# Altium PCB SBC_PCB.PcbDoc (part 4 of 4)
Units mm, origin at the board's own origin, x right, y up, seen from the top; angles counter-clockwise.
Board outline 85 x 56 mm, 8 copper layers (L1(SIG), L2(GND), L3(PWR), L4(SIG), L5(GND), L6(SIG), L7(GND), L8(SIG)), stack 1.593 mm thick; 597 components, 497 nets, 2394 pads, 229 vias.
Unrouted connection lines stored in the file: 1459.
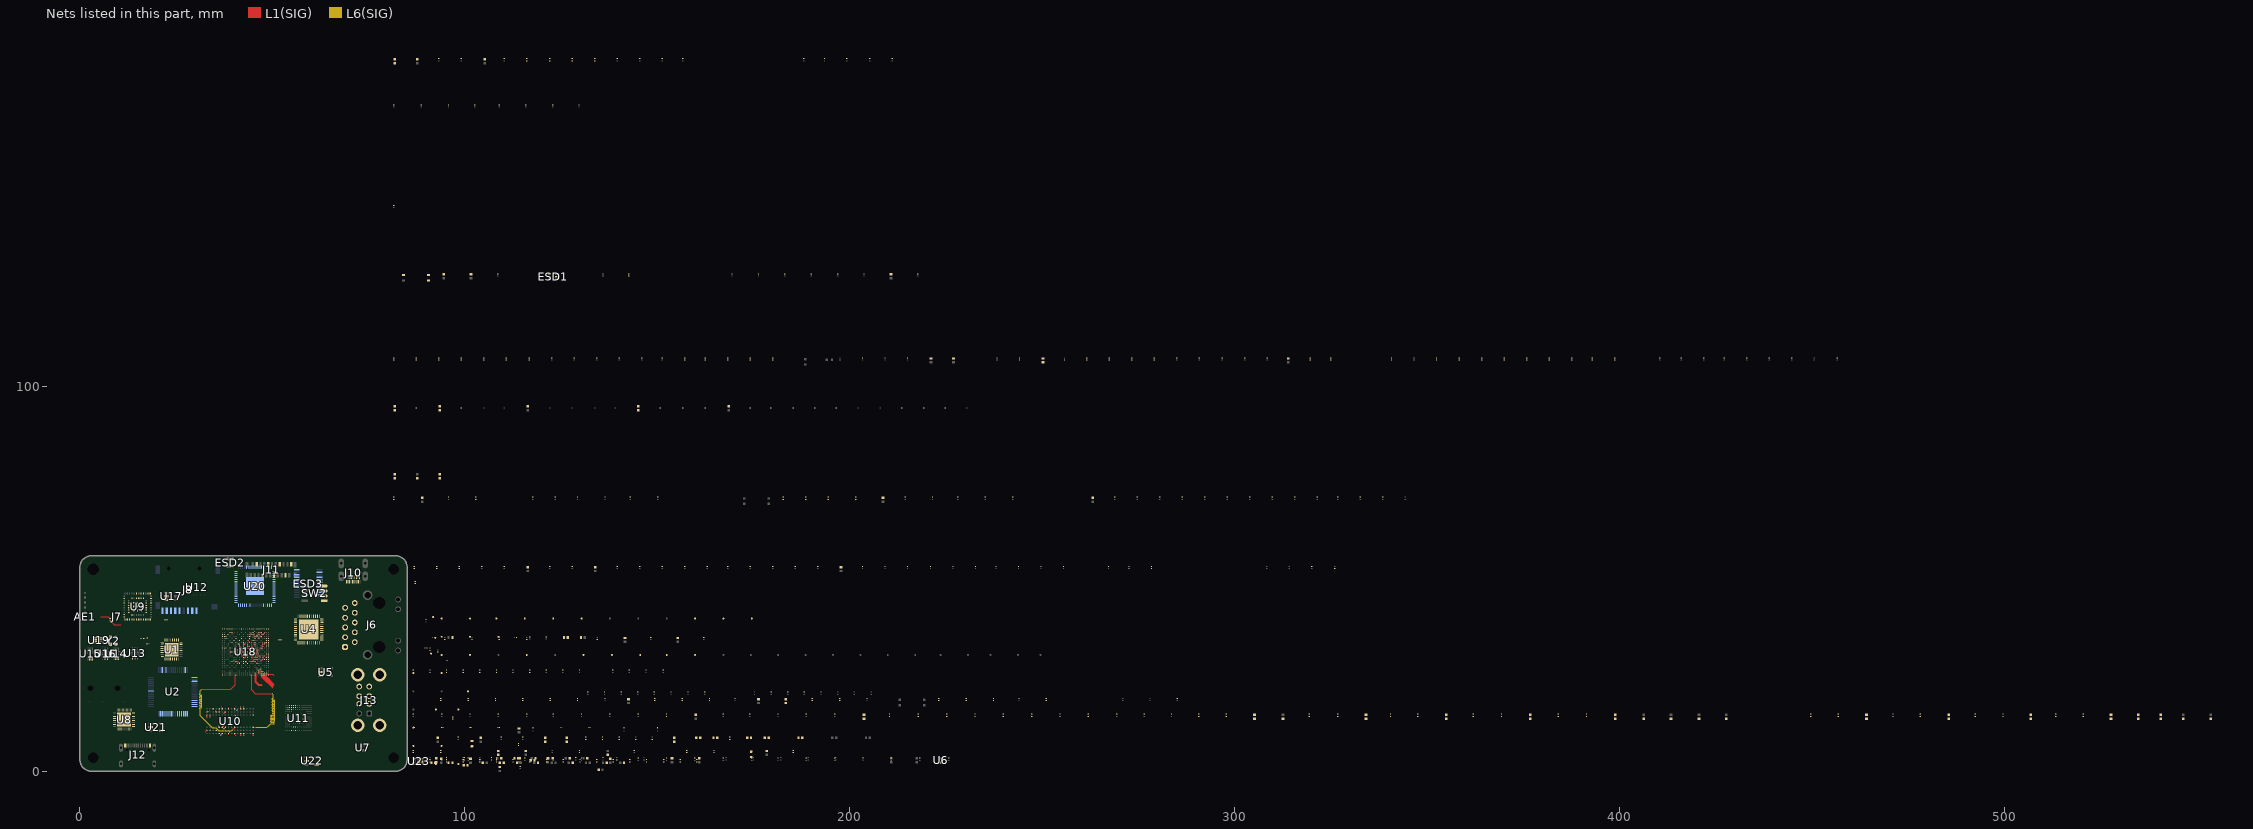
[diagram p5: the nets of this part, all layers, seen from the top]

## Via types
v1: diameter 0.35, hole 0.2, L1(SIG) to L8(SIG), 222 vias
v2: diameter 0.45, hole 0.2, L1(SIG) to L8(SIG), 7 vias

## Nets (pads, with @x,y where several pads share a name; then routed paths per layer and width w, separated by ;. In a path a pad name is that pad's centre, name@x,y a point inside that pad or via, vN(x,y) a via of type N, cw(c..) or ccw(c..) an arc to the next point about the centre after c; other vN are vias at no path point) (continued)
DDR4_LDQS_N: U10.F3 U18.V2 | length 4.6
  L1(SIG) w0.076: U18.V2@45.5,25.5 45.751,25.249 45.751,24.542 45.819,24.475 45.819,24.359
  L1(SIG) w0.11: 45.819,24.359 45.819,23.264 46.464,22.619 47.225,22.619
  L1(SIG) w0.12: U10.F3@37,11.4 37,11.402 37.385,11.787 v1(37.385,11.789)
DDR4_LDQS_P: U10.G3 U18.V1 | length 4.5
  L1(SIG) w0.076: U18.V1@45.5,25 45.5,24.437 45.579,24.359
  L1(SIG) w0.11: 45.579,24.359 45.579,23.165 46.365,22.379 47.319,22.379
  L1(SIG) w0.12: v1(37.415,11.013) v1(37.415,11.013) U10.G3@37.8,11.4 U10.G3@37.8,11.402
DDR4_NC: TP44.TP U10.T7
DDR4_ODT: U10.K3 U18.H1 | length 35.1
  L1(SIG) w0.076: 40.335,24.359 40.335,24.692 40.411,24.768 40.411,24.876 40.5,24.965 U18.H1@40.5,25
  L1(SIG) w0.12: v1(31.496,21.158) 31.503,21.158 31.681,21.336 39.167,21.336 40.335,22.504 40.335,24.359 ; v1(39.878,10.973) 39.878,11.025 40.2,11.347 U10.K3@40.2,11.4
  L6(SIG) w0.11: v1(31.496,21.158) 31.267,20.93 31.267,20.498 31.267,20.262 cw(c31.157,20.262) 31.157,20.152 31.142,20.152 ccw(c31.142,20.08) 31.07,20.08 31.07,19.864 ccw(c31.142,19.864) 31.142,19.792 31.57,19.792 cw(c31.57,19.72) 31.642,19.72 31.642,19.504 cw(c31.57,19.504) 31.57,19.432 31.142,19.432 ccw(c31.142,19.36) 31.07,19.36 31.07,19.144 ccw(c31.142,19.144) 31.142,19.072 31.57,19.072 cw(c31.57,19) 31.642,19 31.642,18.784 cw(c31.57,18.784) 31.57,18.712 31.142,18.712 ccw(c31.142,18.64) 31.07,18.64 31.07,18.424 ccw(c31.142,18.424) 31.142,18.352 31.57,18.352 cw(c31.57,18.28) 31.642,18.28 31.642,18.064 cw(c31.57,18.064) 31.57,17.992 31.142,17.992 ccw(c31.142,17.92) 31.07,17.92 31.07,17.704 ccw(c31.142,17.704) 31.142,17.632 31.57,17.632 cw(c31.57,17.56) 31.642,17.56 31.642,17.344 cw(c31.57,17.344) 31.57,17.272 31.142,17.272 ccw(c31.142,17.2) 31.07,17.2 31.07,16.984 ccw(c31.142,16.984) 31.142,16.912 31.57,16.912 cw(c31.57,16.84) 31.642,16.84 31.642,16.624 cw(c31.57,16.624) 31.57,16.552 31.142,16.552 ccw(c31.142,16.48) 31.07,16.48 31.07,16.264 ccw(c31.142,16.264) 31.142,16.192 31.157,16.192 cw(c31.157,16.082) 31.267,16.082 31.267,16.027 31.267,14.402 34.326,11.343 35.291,11.343 36.068,10.566 39.472,10.566 v1(39.878,10.973)
DDR4_PAR: U10.T3 U18.T1 | length 35.1
  L1(SIG) w0.076: U18.T1@44.5,25 44.5,24.969 44.653,24.816 44.653,24.359
  L1(SIG) w0.12: 44.653,24.359 44.653,21.107 45.593,20.168 50.216,20.168 v1(50.241,20.193) ; U10.T3@45,11.4 45.01,11.39 45.506,11.39 v1(45.517,11.379)
  L6(SIG) w0.11: v1(45.517,11.379) 48.59,11.379 48.95,11.739 49.553,12.342 cw(c49.631,12.264) 49.631,12.374 50.416,12.374 ccw(c50.416,12.446) 50.488,12.446 50.488,12.662 ccw(c50.416,12.662) 50.416,12.734 49.702,12.734 cw(c49.702,12.806) 49.63,12.806 49.63,13.022 cw(c49.702,13.022) 49.702,13.094 50.519,13.094 ccw(c50.519,13.166) 50.591,13.166 50.591,13.382 ccw(c50.519,13.382) 50.519,13.454 49.71,13.454 cw(c49.71,13.526) 49.638,13.526 49.638,13.742 cw(c49.71,13.742) 49.71,13.814 50.519,13.814 ccw(c50.519,13.886) 50.591,13.886 50.591,14.102 ccw(c50.519,14.102) 50.519,14.174 49.71,14.174 cw(c49.71,14.246) 49.638,14.246 49.638,14.462 cw(c49.71,14.462) 49.71,14.534 50.519,14.534 ccw(c50.519,14.606) 50.591,14.606 50.591,14.822 ccw(c50.519,14.822) 50.519,14.894 50.11,14.894 cw(c50.11,14.966) 50.038,14.966 50.038,15.182 cw(c50.11,15.182) 50.11,15.254 50.519,15.254 ccw(c50.519,15.326) 50.591,15.326 50.591,15.542 ccw(c50.519,15.542) 50.519,15.614 50.04,15.614 cw(c50.04,15.686) 49.968,15.686 49.968,15.902 cw(c50.04,15.902) 50.04,15.974 50.519,15.974 ccw(c50.519,16.046) 50.591,16.046 50.591,16.262 ccw(c50.519,16.262) 50.519,16.334 50.04,16.334 cw(c50.04,16.406) 49.968,16.406 49.968,16.622 cw(c50.04,16.622) 50.04,16.694 50.519,16.694 ccw(c50.519,16.766) 50.591,16.766 50.591,16.982 ccw(c50.519,16.982) 50.519,17.054 50.04,17.054 cw(c50.04,17.126) 49.968,17.126 49.968,17.342 cw(c50.04,17.342) 50.04,17.414 50.519,17.414 ccw(c50.519,17.486) 50.591,17.486 50.591,17.702 ccw(c50.519,17.702) 50.519,17.774 50.04,17.774 cw(c50.04,17.846) 49.968,17.846 49.968,18.062 cw(c50.04,18.062) 50.04,18.134 50.519,18.134 ccw(c50.519,18.206) 50.591,18.206 50.591,18.422 ccw(c50.519,18.422) 50.519,18.494 50.04,18.494 cw(c50.04,18.566) 49.968,18.566 49.968,18.782 cw(c50.04,18.782) 50.04,18.854 50.131,18.854 ccw(c50.131,18.964) 50.241,18.964 50.241,19.533 v1(50.241,20.193)
DDR4_TEN: R101.2 R104.1 U10.N9 | length 0.6
  L1(SIG) w0.076: U10.N9@42.596,16.196 U10.N9@42.6,16.2 42.6,16.756 v1(42.604,16.76)
DDR4_UDQS_N: U10.A7 U18.E2 | length 0.6
  L1(SIG) w0.076: v1(32.992,14.036) 32.996,14.04 32.996,14.596 U10.A7@33,14.6
DDR4_UDQS_P: U10.B7 U18.E1 | length 0.6
  L1(SIG) w0.076: v1(33.792,14.036) 33.796,14.04 33.796,14.596 U10.B7@33.8,14.6
DDR4_VREFCA: C115.2 C116.1 C117.1 C118.1 R106.2 R107.1 U10.M1 | length 0.5
  L1(SIG) w0.076: U10.M1@41.796,9.804 U10.M1@41.8,9.8 41.8,9.305 v1(41.804,9.301)
DFP_USB1_EN: R186.1 U18.C20 U21.4
DFP_USB1_N: ESD10.2 J13.2 U18.AD11
DFP_USB1_P: ESD9.2 J13.3 U18.AE11
DFP_USB1_VBUS_SENSE: R184.2 R185.1 U18.AC11 | length 0.4
  L1(SIG) w0.076: v1(47.574,29.997) 47.575,29.999 47.999,29.999 U18.AC11@48,30
DFP_USB1_VBUS_ZN: D9.1 R182.2 R184.1
DFP_USB2_EN: R194.1 U18.F18 U22.4
DFP_USB2_N: ESD12.2 J13.6 U18.AE9
DFP_USB2_P: ESD11.2 J13.7 U18.AD10
DFP_USB2_VBUS_SENSE: R192.2 R193.1 U18.AB10 | length 0.5
  L1(SIG) w0.076: U18.AB10@47.5,29.5 47.505,29.495 47.975,29.495 v1(47.981,29.489)
DFP_USB2_VBUS_ZN: D10.1 R189.2 R192.1
DUSB_SH_GND: C265.2 J13.SH
EEPROM_DO: R12.1 R16.1
EEPROM_ORG: 
EFUSE_DV_DT: C268.2 TP54.TP U23.1
EFUSE_EN: R212.2 R214.1 TP52.TP U23.4
EFUSE_FLT: R213.2 TP53.TP U23.6
EFUSE_ILIM: R215.1 TP55.TP U23.7
EMMC_CLK: R118.1 U18.Y3 | length 0.7
  L1(SIG) w0.076: v1(46.021,26.492) 46.021,26.485 46.5,26.006 U18.Y3@46.5,26
EMMC_CLK_R: R118.2 R119.1 U11.M6
EMMC_CMD: R108.2 U11.M5 U18.AB1 | length 4.1
  L1(SIG) w0.076: U18.AB1@47.5,25 47.5,24.496 47.638,24.359
  L1(SIG) w0.12: 47.638,24.359 50.032,21.965
EMMC_DATA0: R116.2 U11.A3 U18.AA2 | length 5.2
  L1(SIG) w0.076: U18.AA2@47,25.5 47.249,25.251 47.249,24.36 47.25,24.359
  L1(SIG) w0.12: 47.25,24.359 47.336,24.273 47.412,24.273 50.054,21.631
EMMC_DATA1: R115.2 U11.A4 U18.AA1
EMMC_DATA2: R114.2 U11.A5 U18.AA3 | length 0.7
  L1(SIG) w0.076: U18.AA3@47,26 47.005,26.005 47.646,26.005 v1(47.65,26.01)
EMMC_DATA3: R113.2 U11.B2 U18.Y4 | length 0.5
  L1(SIG) w0.076: U18.Y4@46.5,26.5 46.522,26.521 46.994,26.521 v1(47.015,26.543)
EMMC_DATA4: R112.2 U11.B3 U18.AB2 | length 4.4
  L1(SIG) w0.076: U18.AB2@47.5,25.5 47.751,25.249 47.751,24.556 47.949,24.359
  L1(SIG) w0.12: 47.949,24.359 50.136,22.171
EMMC_DATA5: R111.2 U11.B4 U18.AC1 | length 3.6
  L1(SIG) w0.076: U18.AC1@48,25 48,24.618 48.26,24.359
  L1(SIG) w0.12: 48.26,24.359 50.292,22.327
EMMC_DATA6: R110.2 U11.B5 U18.AD2 | length 2.1
  L1(SIG) w0.076: U18.AD2@48.5,25.5 48.751,25.249 49.922,25.249
  L1(SIG) w0.12: 49.922,25.249 50.037,25.249 50.394,24.892
EMMC_DATA7: R109.2 U11.B6 U18.AC2 | length 3.8
  L1(SIG) w0.076: U18.AC2@48,25.5 48.251,25.249 48.251,24.723 48.616,24.359
  L1(SIG) w0.12: 48.616,24.359 50.343,22.631
EMMC_STROBE: R120.1 U11.H5
EMMC_VDDI: C130.1 U11.C2
ETH_MDI_TR0_N: J6.3 U4.3
ETH_MDI_TR0_P: J6.2 U4.2
ETH_MDI_TR1_N: J6.7 U4.6
ETH_MDI_TR1_P: J6.4 U4.5
ETH_MDI_TR2_N: J6.6 U4.8
ETH_MDI_TR2_P: J6.5 U4.7
ETH_MDI_TR3_N: J6.9 U4.11
ETH_MDI_TR3_P: J6.8 U4.10
ETH_PHY_CLK_IN: TP5.TP U4.46
ETH_PHY_INT: R25.2 TP4.TP U4.39
ETH_PHY_ISET: R46.1 U4.48
ETH_RGMII_MDC: U4.37
ETH_RGMII_MDIO: R27.2 U4.38
ETH_RGMII_RXC: R32.1
ETH_RGMII_RXCTL: R33.1
ETH_RGMII_RXD0: R28.1
ETH_RGMII_RXD1: R29.1
ETH_RGMII_RXD2: R30.1
ETH_RGMII_RXD3: R31.1
ETH_RGMII_TXC: R44.1
ETH_RGMII_TXCTL: R45.1
ETH_RGMII_TXD0: R40.1
ETH_RGMII_TXD1: R41.1
ETH_RGMII_TXD2: R42.1
ETH_RGMII_TXD3: R43.1
ETH_SH_GND: C56.2 J6.10
FLASH_QSPI_CS: R125.2 U12.C2 U18.F23 | length 0.4
  L1(SIG) w0.076: U18.F23@39.5,36 39.504,35.996 39.925,35.996 v1(39.929,35.992)
FLASH_QSPI_IO0: R124.2 U12.D3 U18.E25
FLASH_QSPI_IO1: R123.2 U12.D2 U18.G24
FLASH_QSPI_IO2: R122.2 U12.C4 U18.F25
FLASH_QSPI_IO3: R121.2 U12.D4 U18.F24
FLASH_QSPI_SCK: R127.1 U18.H24
FLASH_RESET: R126.2 U12.A4 U18.E24
FS: R2.2 U1.7
FTDI_EECDATA: U2.61
FTDI_EECLK: R13.1 U2.62
FTDI_EECS: R14.1 U2.63
FTDI_OSCI: U2.2
FTDI_OSCO: C22.1 U2.3
FTDI_REF: U2.6
FTDI_RESET: U2.14
GND: AE1.1 C7.2 C11.2 C12.2 C13.2 C14.2 C15.2 C16.2 C17.2 C18.2 C19.2 C20.2 C21.2 C22.2 C23.2 C24.2 C25.2 C26.2 C27.2 C28.2 C29.2 C30.2 C31.2 C32.2 C33.2 C34.2 C35.2 C36.2 C37.2 C38.2 C39.2 C40.2 C41.2 C42.2 C43.2 C44.2 C45.2 C46.2 C47.2 C48.2 C49.2 C50.2 C51.2 C52.2 C53.2 C54.2 C55.2 C56.1 C59.2 C62.2 C67.2 C69.2 C71.2 C72.2 C73.2 C74.2 C75.2 C76.2 C77.2 C78.2 C79.2 C80.2 C81.2 C83.2 C84.2 C85.2 C86.2 C87.2 C88.2 C90.2 C91.2 C92.2 C93.2 C94.2 C95.2 C96.2 C97.2 C98.2 C99.2 C100.2 C101.2 C102.2 C103.2 C104.2 C105.2 C106.2 C107.2 C108.2 C109.2 C110.2 C111.2 C116.2 C117.2 C118.2 C119.2 C120.2 C121.2 C122.2 C123.2 C124.2 C125.2 C126.2 C127.2 C128.2 C129.2 C130.2 C131.2 C132.2 C133.2 C134.2 C135.2 C136.2 C137.2 C138.2 C139.2 C140.2 C141.2 C142.2 C143.2 C144.2 C145.2 C146.2 C147.2 C148.2 C149.2 C150.2 C151.2 C152.2 C153.2 C154.2 C155.2 C156.2 C157.2 C158.2 C159.2 C160.2 C161.2 C162.2 C163.2 C164.2 C165.2 C166.2 C167.2 C168.2 C169.2 C170.2 C171.2 C172.2 C173.2 C174.2 C175.2 C176.2 C177.2 C178.2 C179.2 C180.2 C181.2 C182.2 C183.2 C184.2 C185.2 C186.2 C187.2 C188.2 C189.2 C190.2 C191.2 C192.2 C193.2 C194.2 C195.2 C196.2 C197.2 C198.2 C199.2 C200.2 C201.2 C202.2 C203.2 C204.2 C205.2 C206.2 C207.2 C208.2 C209.2 C210.2 C211.2 C212.2 C213.2 C214.2 C215.2 C216.2 C217.2 C218.2 C219.2 C220.2 C221.2 C222.2 C223.2 C224.2 C225.2 C226.2 C227.2 C228.2 C229.2 C230.2 C231.2 C232.2 C233.2 C234.2 C235.2 C236.2 C237.2 C238.2 C239.2 C240.2 C241.2 C242.2 C243.2 C244.2 C245.2 C246.2 C247.2 C248.2 C249.2 C250.2 C251.2 C252.2 C253.2 C254.2 C255.2 C256.2 C257.2 C258.2 C259.2 C261.2 C263.2 C264.1 C265.1 C266.2 C267.2 C268.1 D9.2 D10.2 ESD1.2 ESD2.2 ESD3.6 ESD3.14 ESD3.19 ESD4.2 ESD5.2 ESD6.1 ESD7.1 ESD8.2 ESD9.1 ESD10.1 ESD11.1 ESD12.1 J7.2 J7.4 J8.6 J11.1 J11.4 J11.7 J11.10 J11.13 J11.16 J11.19 J12.A1 J12.A12 J12.B1 J12.B12 J13.4 J13.8 L6.1 L7.1 R5.1 R8.1 R9.1 R10.1 R18.1 R34.2 R35.2 R36.2 R37.2 R38.2 R39.2 R46.2 R54.2 R55.2 R56.2 R57.2 R58.2 R59.2 R60.1 R69.1 R70.1 R82.2 R90.2 R94.2 R95.2 R96.2 R102.2 R103.2 R104.2 R105.2 R107.2 R119.2 R120.2 R128.2 R136.2 R145.2 R146.2 R155.2 R156.2 R157.2 R158.2 R159.2 R160.2 R161.2 R162.2 R163.2 R164.2 R178.2 R179.2 R180.2 R185.2 R186.2 R187.2 R188.2 R190.1 R193.2 R194.2 R195.1 R204.2 R205.2 R206.2 R207.2 R208.2 R209.2 R210.2 R211.2 R214.2 R215.2 U1.12 U1.24 U1.28 U1.33 U2.1 U2.5 U2.10 U2.11 U2.13 U2.15 U2.25 U2.35 U2.47 U2.51 U4.49 U5.2 U5.3 U6.2 U7.2 U8.15 U8.33 U9.1 U9.14 U9.16 U9.21 U9.23 U9.24 U9.27 U9.34 U9.41 U9.57 U9.69 U9.70 U9.71 U9.72 U9.73 U9.74 U9.75 U9.76 U9.77 U10.A2 U10.A8 U10.B2 U10.C9 U10.D2 U10.D8 U10.E1 U10.E3 U10.E8 U10.E9 U10.F1 U10.G8 U10.H1 U10.H9 U10.K1 U10.K9 U10.M9 U10.N1 U10.T1 U11.A6 U11.C4 U11.E7 U11.G5 U11.H10 U11.J5 U11.K8 U11.N2 U11.N5 U11.P4 U11.P6 U12.B3 U13.5 U13.7 U13.8 U14.6 U14.7 U14.8 U15.6 U15.7 U15.8 U16.6 U16.7 U16.8 U17.2 U18.A1 U18.A24 U18.A25 U18.AA11 U18.AB9 U18.AD1 U18.AD9 U18.AD12 U18.AD16 U18.AD25 U18.AE1 U18.AE8 U18.AE12 U18.AE16 U18.AE24 U18.AE25 U18.B25 U18.F13 U18.G13 U18.G19 U18.H13 U18.H16 U18.H18 U18.H20 U18.J7 U18.J13 U18.K7 U18.K13 U18.K15 U18.K19 U18.L20 U18.M7 U18.M8 U18.M10 U18.M12 U18.M13 U18.M17 U18.M18 U18.N15 U18.P7 U18.P10 U18.P13 U18.R13 U18.R15 U18.R18 U18.R20 U18.T8 U18.T13 U18.T14 U18.T16 U18.T17 U18.T18 U18.U8 U18.U19 U18.V9 U18.V10 U18.V11 U18.V13 U18.V16 U18.V18 U18.W7 U18.Y2 U19.4 U20.43 U20.55 U20.57 U20.63 U20.70 U20.73 U21.2 U22.2 U23.8 Y2.2 | length 15.1
  L1(SIG) w0.076: v1(35.89,11.836) 35.89,11.773 36.2,11.463 U10.E3@36.2,11.4 ; U10.H1@38.596,9.804 U10.H1@38.6,9.8 38.6,9.305 v1(38.604,9.301) ; U10.H9@38.596,16.196 U10.H9@38.6,16.2 38.6,16.756 v1(38.604,16.76) ; v1(39.04,30.988) 39.046,30.994 39.494,30.994 U18.F13@39.5,31 ; U10.K1@40.196,9.804 U10.K1@40.2,9.8 40.2,9.305 v1(40.204,9.301) ; v1(42.012,30.988) 42.018,30.994 42.494,30.994 U18.M13@42.5,31 ; U18.M10@42.5,29.5 42.518,29.482 42.959,29.482 v1(42.977,29.464) ; U18.M17@42.5,33 42.525,33.025 42.945,33.025 v1(42.97,33.051) ; U10.N1@42.596,9.804 U10.N1@42.6,9.8 42.6,9.305 v1(42.604,9.301) ; v1(43.51,32.004) 43.512,32.002 43.998,32.002 U18.R15@44,32 ; U18.R18@44,33.5 44.009,33.509 44.009,34.001 v1(44.018,34.011) ; U18.T13@44.5,31 44.519,31.019 44.964,31.019 v1(44.983,31.039) ; U18.T16@44.5,32.5 44.519,32.481 44.913,32.481 v1(44.933,32.461) ; v1(44.984,29) 44.992,28.993 44.992,28.508 U18.U8@45,28.5 ; U10.T1@44.996,9.804 U10.T1@45,9.8 45,9.305 v1(45.004,9.301) ; U18.U19@45,34 45.02,33.98 45.421,33.98 v1(45.441,33.96) ; U18.V11@45.5,30 45.501,29.999 v1(46.025,29.997) v1(46.025,29.997) ; U18.W7@46,28 46.005,27.995 46.503,27.995 v1(46.507,27.991) ; v1(46.103,25.948) 46.103,25.922 46.5,25.526 U18.Y2@46.5,25.5 ; v1(47.041,28.981) 47.05,28.991 47.491,28.991 U18.AB9@47.5,29
  L1(SIG) w0.12: v1(32.615,10.213) v1(32.615,10.213) U10.A2@33,10.6 U10.A2@33,10.602 ; U10.A8@33,15.4 33.039,15.4 33.387,15.748 v1(33.426,15.748) ; v1(35.013,15.785) v1(35.013,15.785) U10.D8@35.4,15.4 U10.D8@35.402,15.4 ; U10.E8@36.2,15.398 U10.E8@36.2,15.4 v1(36.585,15.787) v1(36.585,15.787) ; v1(36.615,9.413) v1(36.615,9.413) U10.F1@37,9.8 U10.F1@37,9.802 ; v1(37.415,15.013) 37.415,15.015 U10.G8@37.8,15.4 U10.G8@37.8,15.4 ; v1(40.198,16.747) v1(40.198,16.747) 40.199,16.201 U10.K9@40.2,16.2 ; v1(41.811,16.754) 41.812,16.753 41.812,16.208 U10.M9@41.813,16.206
  L1(SIG) w0.3: v1(40.475,28.029) 40.497,28.007 40.993,28.007 U18.J7@41,28
  other v1: 43.967,35.535
  other v2: 1.327,41.284 1.327,42.564 1.327,43.844 1.327,45.124 1.327,46.404
GPIO_1: TP33.TP U9.45
HDM_CONN_CEC: ESD3.7 J10.15
HDM_CONN_HPD: ESD3.10 J10.1
HDM_CONN_SCL: ESD3.8 J10.17
HDM_CONN_SDA: ESD3.9 J10.18
HDMI_CONN_TX0_N: ESD3.17 J10.11 U20.61
HDMI_CONN_TX0_P: ESD3.18 J10.9 U20.62
HDMI_CONN_TX1_N: ESD3.20 J10.8 U20.64
HDMI_CONN_TX1_P: ESD3.21 J10.6 U20.65
HDMI_CONN_TX2_N: ESD3.22 J10.5 U20.67
HDMI_CONN_TX2_P: ESD3.23 J10.3 U20.68
HDMI_CONN_TXC_N: J10.14 U20.58
HDMI_CONN_TXC_P: ESD3.16 J10.12 U20.59
HDMI_D0: U18.U22 U20.32 | length 0.4
  L1(SIG) w0.076: U18.U22@45,35.5 45.033,35.467 45.331,35.467 v1(45.367,35.43)
HDMI_D1: U18.V24 U20.31
HDMI_D2: U18.W25 U20.30
HDMI_D3: U18.W24 U20.29
HDMI_D4: U18.Y25 U20.28
HDMI_D5: U18.Y24 U20.27
HDMI_D6: U18.Y23 U20.25 | length 0.4
  L1(SIG) w0.076: v1(46.076,35.992) 46.08,35.996 46.496,35.996 U18.Y23@46.5,36
HDMI_D7: U18.AA25 U20.24
HDMI_D8: U18.V21 U20.23 | length 0.5
  L1(SIG) w0.076: v1(45.033,34.872) 45.134,34.872 45.261,34.999 U18.V21@45.5,35 U18.V21@45.5,35
HDMI_D9: U18.W21 U20.20 | length 0.3
  L1(SIG) w0.076: U18.W21@46,35 46.006,35.006 46.006,35.339 v1(46.012,35.345)
HDMI_D10: U18.V20 U20.19 | length 0.5
  L1(SIG) w0.076: U18.V20@45.5,34.5 45.503,34.497 45.945,34.497 v1(45.949,34.493)
HDMI_D11: U18.AA23 U20.18 | length 0.4
  L1(SIG) w0.076: U18.AA23@47,36 47.024,36.024 47.363,36.024 v1(47.386,36.047)
HDMI_D12: U18.AB25 U20.17
HDMI_D13: U18.AA24 U20.16
HDMI_D14: U18.Y22 U20.15 | length 0.5
  L1(SIG) w0.076: U18.Y22@46.5,35.5 46.517,35.517 46.922,35.517 v1(46.939,35.535)
HDMI_D15: U18.AA21 U20.14 | length 0.4
  L1(SIG) w0.076: U18.AA21@47.001,35.001 v1(47.396,35.001)
HDMI_D16: R154.2 R164.1 R169.1 U18.R24
HDMI_D17: R153.2 R163.1 R170.1 U18.R25
HDMI_D18: R152.2 R162.1 R171.1 U18.T25
HDMI_D19: R151.2 R161.1 R172.1 U18.R21 | length 0.4
  L1(SIG) w0.076: U18.R21@44,35 44.019,35.019 44.386,35.019 v1(44.405,35.039)
HDMI_D20: R150.2 R160.1 R173.1 U18.T22 | length 0.4
  L1(SIG) w0.076: U18.T22@44.5,35.5 44.513,35.513 44.513,35.902 v1(44.526,35.916)
HDMI_D21: R149.2 R159.1 R174.1 U18.T24
HDMI_D22: R148.2 R158.1 R175.1 U18.U25
HDMI_D23: R147.2 R157.1 R176.1 U18.U24
HDMI_DE: U18.Y20 U20.33 | length 0.4
  L1(SIG) w0.076: U18.Y20@46.5,34.5 46.504,34.504 46.504,34.87 v1(46.507,34.874)
HDMI_HSYNC: U18.AB24 U20.34
HDMI_I2C_ADDR: R167.2 U20.72
HDMI_I2C_SCL: U20.1
HDMI_I2C_SDA: U20.2
HDMI_I2S_DIN: U18.L25 U20.41
HDMI_I2S_SCK: U18.M24 U20.45
HDMI_I2S_WS: U18.U23 U20.44 | length 0.4
  L1(SIG) w0.076: U18.U23@45,36 45.033,36.033 45.294,36.033 v1(45.34,36.079)
HDMI_IDCK: R168.1 U18.AC24
HDMI_TX_CEC: U20.71
HDMI_TX_HPD: U20.54
HDMI_TX_SCL: U20.49
HDMI_TX_SDA: U20.48
HDMI_VSYNC: U18.AC25 U20.35
I2C_SCl: U1.16
I2C_SDA: U1.17
I2S_ADCOUT: R3.1 U18.E15
I2S_BCLK: R1.1 U18.B15
I2S_DACIN: R4.1 U18.C15
I2S_FS: R2.1 U18.A15
IDCK: R168.2 U20.22
JACK_DETECT: TP2.TP U1.3
JTAG_SEL: TP37.TP U9.53
JTAG_TCK: TP38.TP U9.66
JTAG_TDI: TP41.TP U9.64
JTAG_TDO: TP42.TP U9.65
JTAG_TMS: TP40.TP U9.67
LAUXIN: C4.1 U1.19
LDO1_VOUT: C76.1 R74.1 TP20.TP U8.7
LDO2_VOUT: C77.1 R75.1 TP21.TP U8.19
LDO3_VOUT: C78.1 R76.1 TP22.TP U8.21
LDO4_VOUT: C79.1 R77.1 TP23.TP U8.23
LHP: U1.30
LHP_CON: 
LMICN: C7.1 U1.2
LMICP: C8.1 U1.1
LMICP_CON: C8.2 R7.2
LPO_IN: U9.5
LSPKOUT: U1.25
NetAE1_4: AE1.4 C82.2 L7.2 | length 2.6
  L1(SIG) w0.254: 5.461,40.132 7.362,40.132 7.828,39.666 C82.2@7.874,39.666
NetC4_2: C4.2
NetC11_1: C11.1 U1.27
NetC33_1: C33.1 C34.1 FB1.2 U2.9
NetC35_1: C35.1 C36.1 FB2.2 U2.4
NetC43_1: C43.1 C44.1 C45.1 FB3.1 U4.1 U4.12
NetC51_1: C51.1 C52.1 C53.1 C54.1 FB4.1 U4.23 U4.27 U4.31 U4.40
NetC55_1: C55.1 J6.1
NetC82_1: C82.1 J7.1 L6.2 | length 3.1
  L1(SIG) w0.254: C82.1@7.874,39.116 7.92,39.116 8.936,38.1 10.546,38.1
NetC89_1: C89.1 R97.1 R98.1
NetC112_2: C112.2 C113.2 C114.2
NetC243_1: C243.1 C244.1 C245.1 FB14.2 U20.60 U20.66
NetC247_1: C247.1 C248.1 C249.1 FB15.2 U20.3 U20.21 U20.46
NetC251_1: C251.1 C252.1 C253.1 C254.1 C255.1 C256.1 FB16.2 U20.5 U20.12 U20.26 U20.42 U20.47 U20.53
NetESD3_5: ESD3.5 ESD3.12 R181.2
NetJ7_3: J7.3@10.475,40.132 U9.22
NetL4_1: U8.29
NetL5_1: U8.27
NetR5_2: R5.2 U1.18
NetR47_2: R47.2 R54.1 U4.13
NetR48_2: R48.2 R55.1 U4.14
NetR49_2: R49.2 R56.1 U4.18
NetR50_2: R50.2 R57.1 U4.16
NetR51_2: R51.2 R58.1 U4.15
NetR52_2: R52.2 R53.2 R59.1 U4.42
NetR53_1: R53.1
NetR105_1: R105.1 U10.F9 | length 0.6
  L1(SIG) w0.076: U10.F9@36.996,16.196 U10.F9@37,16.2 37,16.756 v1(37.004,16.76)
NetR138_1: R138.1 TP47.TP Y2.1
NetR144_1: R144.1 TP48.TP U19.2
NetR177_2: R177.2 R179.1 U20.69
NetR178_1: R178.1 U20.36
NetR180_1: R180.1 U20.56
NetR197_2: R197.2 SW2.8
NetR198_2: R198.2 SW2.7
NetR199_2: R199.2 SW2.6
NetR200_2: R200.2 SW2.5
NetTP1_TP: TP1.TP U1.15
NetTP3_TP: TP3.TP U1.6
NetTP49_TP: TP49.TP U20.50
NetU18_AA15: U18.AA15 | length 0.4
  L1(SIG) w0.076: U18.AA15@47,32 47.004,31.996 47.424,31.996 v1(47.428,31.992)
NetU18_AB16: U18.AB16 | length 0.4
  L1(SIG) w0.076: v1(47.117,32.563) 47.148,32.531 47.469,32.531 U18.AB16@47.5,32.5
NetU18_AB17: U18.AB17 | length 0.4
  L1(SIG) w0.076: v1(47.426,33.356) 47.467,33.316 47.467,33.033 U18.AB17@47.5,33
NetU18_AB22: U18.AB22 | length 0.7
  L1(SIG) w0.076: U18.AB22@47.5,35.5 47.547,35.5 47.608,35.561 47.626,35.561 v1(48.031,35.966)
NetU18_AC17: U18.AC17 | length 0.4
  L1(SIG) w0.076: U18.AC17@48,33 48.033,33.033 48.033,33.305 v1(48.076,33.348)
NetU18_AD17: U18.AD17
NetU18_AD18: U18.AD18
NetU18_AD19: U18.AD19
NetU18_AD20: U18.AD20
NetU18_AD24: U18.AD24
NetU18_AE17: U18.AE17
NetU18_AE18: U18.AE18
NetU18_AE19: U18.AE19
NetU18_AE20: U18.AE20
OSC_OUT: R139.1 Y2.3
OSC_OUT_BUFF_IN: U19.1
OUT0: R140.1 U19.3
OUT1: R141.1 U19.8
OUT2: R142.1 U19.5
OUT3: R143.1 U19.7
PCM_CLK: R89.2 U9.7
PMIC_GPIO: TP24.TP U8.16
PMIC_LPM_EN0: R81.2 TP29.TP U8.31
PMIC_MODE_RESET: TP30.TP U8.28
PMIC_SCL: U8.10
PMIC_SDA: U8.9
PMIIC_GPIO2: TP26.TP U8.17
PWR_EN: D5.2 D6.2 R137.2 TP46.TP U17.3
QSPI_SCK: R127.2 R128.1 U12.B2
RAUXIN: C3.1 U1.20
RAUXIN_CON: C3.2
RF_SW_CTRL_0: TP31.TP U9.26
RF_SW_CTRL_5: TP32.TP U9.25
RGMII_RXC: R20.2 R32.2 R35.1 U4.36
RGMII_RXCTL: R19.2 R33.2 R34.1 U4.34
RGMII_RXD0: R24.2 R28.2 R39.1 U4.33
RGMII_RXD1: R23.2 R29.2 R38.1 U4.32
RGMII_RXD2: R22.2 R30.2 R37.1 U4.30
RGMII_RXD3: R21.2 R31.2 R36.1 U4.29
RGMII_TXC: R44.2 U4.25
RGMII_TXCTL: R45.2 U4.26
RGMII_TXD0: R40.2 U4.19
RGMII_TXD1: R41.2 U4.20
RGMII_TXD2: R42.2 U4.21
RGMII_TXD3: R43.2 U4.22
RHP: C12.1 R6.1 R7.1 U1.29 U1.32
RHP_CON: 
RMICN: C10.1 U1.5
RMICN_CON: C10.2 R8.2
RMICP: C9.1 U1.4
RMICP_CON: C9.2 R6.2
RSPKOUT: U1.23
SD_CD: ESD2.4 J8.9 R129.2 TP45.TP U18.D17
SD_CLK: R135.1 U18.B22
SD_CLK_R: ESD2.6 J8.5 R135.2 R136.1
SD_CMD: ESD2.1 J8.3 R130.2 U18.A21
SD_DATA0: ESD1.1 J8.7 R134.2 U18.A22
SD_DATA1: ESD1.6 J8.8 R133.2 U18.B21
SD_DATA2: ESD1.4 J8.1 R132.2 U18.C21
SD_DATA3: ESD1.3 J8.2 R131.2 U18.D22
SDIO_CLK: R88.2 U9.33
SOC_VPP: U18.J8 | length 0.5
  L1(SIG) w0.076: U18.J8@41,28.5 41.008,28.492 41.459,28.492 v1(41.467,28.483)
SR_VLX: U9.2
STRAP_0: R91.2 R94.1 U9.56
STRAP_1: R92.2 R95.1 U9.54
STRAP_2: R93.2 R96.1 U9.55
TRST_L: TP43.TP U9.63
USB1_RCLAIB: R156.1 U18.AE10
USB2_MONCDR: TP39.TP U9.48
USB2_RCLAIB: R155.1 U18.AC9
USB2_RREF: R90.1 U9.50
uSD_PWR_EN: D5.1
UUSB_SH_GND: C264.2
VDD1P8: C81.1 U8.2 U8.3 U8.14
VDD_CORE: C157.1 C158.1 C159.1 C160.1 C161.1 C162.1 C163.1 C164.1 C165.1 C166.1 C167.1 C168.1 C169.1 C170.1 C171.1 C172.1 C173.1 C174.1 C221.1 FB5.2 FB6.2 R71.2 U18.F8 U18.H8 U18.J11 U18.J14 U18.K17 U18.L12 U18.L15 U18.M16 U18.N8 U18.N11 U18.N13 U18.P17 U18.R11 U18.R14 U18.U12 U18.V8 U18.V15 U18.V17 | length 4.5
  L1(SIG) w0.076: v1(40.03,28.55) 40.055,28.525 40.475,28.525 U18.H8@40.5,28.5 ; v1(40.513,31.521) 40.524,31.511 40.989,31.511 U18.J14@41,31.5 ; v1(41.097,33.045) 41.12,33.023 41.477,33.023 U18.K17@41.5,33 ; v1(41.504,30.48) 41.514,30.49 41.99,30.49 U18.L12@42,30.5 ; U18.M16@42.5,32.5 42.533,32.467 42.533,32.195 v1(42.576,32.152) ; U18.N11@43,30 43.027,29.973 43.407,29.973 v1(43.434,29.947) ; U18.N8@43,28.5 v1(43.485,28.499) ; v1(45.147,33.075) 45.189,33.033 45.467,33.033 U18.V17@45.5,33 ; U18.V8@45.501,28.499 v1(45.949,28.499) ; U18.V15@45.5,32 45.502,32.002 45.921,32.002 v1(45.923,32.004)
VDDA_1P8_CSIRX0: C151.1 C152.1 C153.1 FB7.1 U18.W14 | length 0.5
  L1(SIG) w0.076: U18.W14@46,31.5 46.002,31.498 46.455,31.498 v1(46.457,31.496)
VDDA_1P8_OLDI0: C175.1 C176.1 C177.1 FB9.1 U18.W9 U18.W10 | length 0.5
  L1(SIG) w0.076: U18.W9@46,29 46.047,29 46.171,29.124 46.371,29.124 v1(46.423,29.177)
VDDA_1P8_USB: C154.1 C155.1 C156.1 FB8.1 U18.Y11 | length 0.6
  L1(SIG) w0.076: U18.Y11@46.5,30 46.76,29.74 46.76,29.618 v1(46.812,29.566)
VDDA_CORE_CSIRX0: C148.1 C149.1 C150.1 FB6.1 U18.W13 | length 0.7
  L1(SIG) w0.076: U18.W13@46,31 46.006,31 46.478,30.528 v1(46.48,30.528)
VDDA_CORE_USB: C145.1 C146.1 C147.1 FB5.1 U18.W12 | length 0.5
  L1(SIG) w0.076: v1(45.517,30.505) 45.52,30.503 45.997,30.503 U18.W12@46,30.5
VDDA_MCU: C178.1 C179.1 C180.1 FB10.1 U18.L11 | length 0.5
  L1(SIG) w0.076: U18.L11@42,30 42.001,29.999 v1(42.494,29.997) v1(42.494,29.997)
VDDA_PLL0: C181.1 C182.1 C183.1 FB11.1 U18.U11 | length 0.5
  L1(SIG) w0.076: v1(44.552,30.039) 44.591,30 U18.U11@45,30
VDDA_PLL1: C184.1 C185.1 C186.1 FB12.1 U18.U15 | length 0.5
  L1(SIG) w0.076: v1(44.533,31.949) 44.558,31.974 44.974,31.974 U18.U15@45,32
VDDA_PLL2: C190.1 C191.1 C192.1 FB13.1 U18.L14 | length 0.4
  L1(SIG) w0.076: U18.L14@42,31.5 42.011,31.511 42.407,31.511 v1(42.418,31.521)
VDDR_CORE: C193.1 C194.1 C195.1 C196.1 C197.1 C198.1 C199.1 C200.1 C201.1 R75.2 U18.J12 U18.K16 U18.N12 U18.N14 U18.P16 U18.R12 U18.T10 U18.U14 | length 2.9
  L1(SIG) w0.076: v1(40.538,30.505) 40.541,30.503 40.997,30.503 U18.J12@41,30.5 ; U18.K16@41.5,32.5 41.533,32.467 41.823,32.467 v1(41.862,32.428) ; U18.N12@43,30.5 43.003,30.503 43.56,30.503 v1(43.625,30.568) ; U18.P16@43.5,32.5 43.506,32.506 43.961,32.506 v1(43.967,32.512) ; U18.T10@44.5,29.5 44.525,29.525 44.955,29.525 v1(44.981,29.55) ; U18.U14@45,31.5 45.011,31.511 45.43,31.511 v1(45.441,31.521)
VIN_LDO: C88.1 U9.43
VREGOUT: C24.1 C25.1 C26.1 C27.1 U2.12 U2.37 U2.49 U2.64
VSEL_SD: R82.1 TP28.TP U8.12
WIFI_SDIO_CLK: R88.1 U18.D25
WIFI_SDIO_CMD: R87.2 U9.28 U18.C24
WIFI_SDIO_DATA_0: R86.2 U9.30 U18.B24
WIFI_SDIO_DATA_1: R85.2 U9.29 U18.C25
WIFI_SDIO_DATA_2: R84.2 U9.32 U18.E23
WIFI_SDIO_DATA_3: R83.2 U9.31 U18.D24
WIFI_USB_DM: U9.46
WIFI_USB_DP: U9.47
WL_HOST_WAKE: U9.52
WL_REG_EN: U9.4
XTAL_OUT: C21.1 R17.1
pads on no net: AE1.2 AE1.3 D1.1 D6.1 D7.2 D8.1 D8.2 ESD2.3 ESD3.1 ESD3.2 ESD3.3 ESD3.4 ESD3.11 ESD3.13 J4.2 J4.3 J4.4 J4.5 J4.6 J4.7 J6.11 J6.12 J6.13 J6.14 J6.M1 J6.M2 J6.S1 J6.S2 J7.3@8.79,40.132 J7.3@10.26,40.132 J8.14 J8.15 J8.SH J10.2 J10.4 J10.7 J10.10 J10.13 J10.16 J10.SH J11.SH J12. J12.A8 J12.B8 J12.S1 R11.2 R12.2 R13.2 R14.2 R15.2 R16.2 R17.2 R18.2 R60.2 R80.2 R138.2 R139.2 R140.2 R141.2 R142.2 R143.2 R144.2 R165.2 R190.2 R195.2 TP27.TP TP50.TP U2.21 U2.22 U2.23 U2.24 U2.30 U2.32 U2.33 U2.34 U2.36 U2.43 U2.44 U2.45 U2.46 U2.55 U2.57 U2.58 U2.59 U2.60 U4.44 U4.45 U5.4 U8.25 U9.15 U9.35 U9.36 U9.37 U9.38 U9.39 U9.40 U9.44 U9.58 U9.59 U9.60 U9.61 U9.62 U11.A1 U11.A2 U11.A7 U11.A8 U11.A9 U11.A10 U11.A11 U11.A12 U11.A13 U11.A14 U11.B1 U11.B7 U11.B8 U11.B9 U11.B10 U11.B11 U11.B12 U11.B13 U11.B14 U11.C1 U11.C3 U11.C5 U11.C7 U11.C8 U11.C9 U11.C10 U11.C11 U11.C12 U11.C13 U11.C14 U11.D1 U11.D2 U11.D3 U11.D4 U11.D12 U11.D13 U11.D14 U11.E1 U11.E2 U11.E3 U11.E5 U11.E8 U11.E9 U11.E10 U11.E12 U11.E13 U11.E14 U11.F1 U11.F2 U11.F3 U11.F10 U11.F12 U11.F13 U11.F14 U11.G1 U11.G2 U11.G3 U11.G10 U11.G12 U11.G13 U11.G14 U11.H1 U11.H2 U11.H3 U11.H12 U11.H13 U11.H14 U11.J1 U11.J2 U11.J3 U11.J12 U11.J13 U11.J14 U11.K1 U11.K2 U11.K3 U11.K6 U11.K7 U11.K10 U11.K12 U11.K13 U11.K14 U11.L1 U11.L2 U11.L3 U11.L12 U11.L13 U11.L14 U11.M1 U11.M2 U11.M3 U11.M7 U11.M8 U11.M9 U11.M10 U11.M11 U11.M12 U11.M13 U11.M14 U11.N1 U11.N3 U11.N6 U11.N7 U11.N8 U11.N9 U11.N10 U11.N11 U11.N12 U11.N13 U11.N14 U11.P1 U11.P2 U11.P7 U11.P8 U11.P9 U11.P10 U11.P11 U11.P12 U11.P13 U11.P14 U12.A2 U12.A3 U12.A5 U12.B1 U12.B5 U12.C U12.C1 U12.C3 U12.D1 U12.D5 U12.E1 U12.E2 U12.E3 U12.E4 U12.E5 U13.13 U13.14 U14.13 U14.14 U15.13 U15.14 U16.13 U16.14 U17.4 U18.A2 U18.A3 U18.A4 U18.A5 U18.A6 U18.A7 U18.A8 U18.A9 U18.A10 U18.A11 U18.A12 U18.A13 U18.A14 U18.A16 U18.A17 U18.A18 U18.A19 U18.A20 U18.A23 U18.AA5 U18.AA7 U18.AA8 U18.AA12 U18.AA18 U18.AA19 U18.AB4 U18.AB6 U18.AB20 U18.AC5 U18.AC6 U18.AC20 U18.AC21 U18.AD3 U18.AD4 U18.AD5 U18.AD6 U18.AD7 U18.AD8 U18.AD21 U18.AD22 U18.AD23 U18.AE2 U18.AE3 U18.AE4 U18.AE5 U18.AE6 U18.AE7 U18.AE21 U18.AE22 U18.AE23 U18.B1 U18.B2 U18.B3 U18.B4 U18.B5 U18.B6 U18.B7 U18.B8 U18.B9 U18.B10 U18.B11 U18.B12 U18.B13 U18.B14 U18.B16 U18.B17 U18.B19 U18.B23 U18.C1 U18.C2 U18.C5 U18.C6 U18.C9 U18.C11 U18.C13 U18.C17 U18.D1 U18.D2 U18.D4 U18.D6 U18.D9 U18.D10 U18.D12 U18.D14 U18.D16 U18.E5 U18.E7 U18.E8 U18.E11 U18.E12 U18.E14 U18.E19 U18.E21 U18.F6 U18.F20 U18.F22 U18.G21 U18.G25 U18.H21 U18.H25 U18.J3 U18.J4 U18.J22 U18.J23 U18.J24 U18.J25 U18.K2 U18.K22 U18.K24 U18.K25 U18.L21 U18.L23 U18.L24 U18.M21 U18.M22 U18.N2 U18.N20 U18.P25 U18.T2 U18.U4 U18.V25 U18.Y6 U18.Y8 U18.Y15 U18.Y18 U20.37 U20.38 U20.39 U20.40 U20.51 U23.2 U23.9
copper on no net: | length 2.1
  L1(SIG) w0.076: v1(37.957,27.944) 37.979,27.922 37.979,27.521 38,27.5 ; v1(37.998,26.543) 37.999,26.999 ; 38.5,26.5 38.503,26.503 38.503,26.845 v1(38.506,26.848) ; 38.5,27.5 38.503,27.503 38.503,27.911 v1(38.506,27.915) ; 39,27 39.02,27.02 39.02,27.361 v1(39.04,27.381)
  other v2: 88.016,2.059 88.016,3.159

## Silkscreen, mask and mechanical layers (free items; w line width, h text height)
Outline:
  the board outline again, w0.013
Mechanical 2:
  circle w0.013: c56.26,51.46 r0.42
  circle w0.013: c56.26,54 r0.42
  circle w0.013: c53.72,51.46 r0.42
  circle w0.013: c53.72,54 r0.42
  circle w0.013: c51.18,51.46 r0.42
  circle w0.013: c51.18,54 r0.42
  circle w0.013: c48.64,51.46 r0.42
  circle w0.013: c48.64,54 r0.42
  circle w0.013: c46.1,51.46 r0.42
  circle w0.013: c46.1,54 r0.42
  circle w0.013: c43.56,51.46 r0.42
  circle w0.013: c43.56,54 r0.42
  circle w0.013: c41.02,51.46 r0.42
  circle w0.013: c41.02,54 r0.42
  circle w0.013: c38.48,51.46 r0.42
  circle w0.013: c38.48,54 r0.42
  circle w0.013: c35.94,51.46 r0.42
  circle w0.013: c35.94,54 r0.42
  circle w0.013: c33.4,51.46 r0.42
  circle w0.013: c33.4,54 r0.42
  circle w0.013: c30.86,51.46 r0.42
  circle w0.013: c30.86,54 r0.42
  circle w0.013: c28.32,51.46 r0.42
  circle w0.013: c28.32,54 r0.42
  circle w0.013: c25.78,51.46 r0.42
  circle w0.013: c25.78,54 r0.42
  circle w0.013: c23.24,51.46 r0.42
  circle w0.013: c23.24,54 r0.42
  circle w0.013: c20.7,51.46 r0.42
  circle w0.013: c20.7,54 r0.42
  circle w0.013: c18.16,51.46 r0.42
  circle w0.013: c18.16,54 r0.42
  circle w0.013: c15.62,51.46 r0.42
  circle w0.013: c15.62,54 r0.42
  circle w0.013: c13.08,51.46 r0.42
  circle w0.013: c13.08,54 r0.42
  circle w0.013: c10.54,51.46 r0.42
  circle w0.013: c10.54,54 r0.42
  circle w0.013: c8,51.46 r0.42
  circle w0.013: c8,54 r0.42
  circle w0.013: c61.5,3.5 r3
  circle w0.013: c3.5,3.5 r3
  circle w0.013: c61.5,52.5 r3
  circle w0.013: c3.5,52.5 r3
  circle w0.013: c61.5,3.5 r1.35
  circle w0.013: c3.5,3.5 r1.35
  circle w0.013: c61.5,52.5 r1.5
  circle w0.013: c3.5,52.5 r1.5
  lines w0.013: -8,0 -4,0 ; -8,56 -4,56 ; -6,0 -6,56 ; 0,57.5 0,62 ; 0,60 85,60 ; 3.5,55 3.5,68 ; 3.5,67 61.5,67 ; 11.2,-3 11.2,9 ; 25.8,-3 25.8,9 ; 39.2,-3 39.2,9 ; 61.5,55 61.5,68 ; 64,10.2 92,10.2 ; 64,29.1 92,29.1 ; 64,47 92,47 ; 85,57.5 85,62 ; 93,3.5 99,3.5 ; 93,52.5 99,52.5 ; 96,3.5 96,52.5 ; -2,22.5 -2,35.5 4.4,35.5 4.4,22.5 -2,22.5 ; 0,3 ccw(c3,3) 3,0 82,0 ccw(c82,3) 85,3 85,53 ccw(c82,53) 82,56 3,56 ccw(c3,53) 0,53 0,3 ; 6.7,50.15 6.7,55.35 57.9,55.35 57.9,50.15 6.7,50.15 ; 7.2,-1.4 7.2,6.8 15.2,6.8 15.2,-1.4 7.2,-1.4 ; 22.5,-1.4 22.5,7 29,7 29,-1.4 22.5,-1.4 ; 35.8,-1.4 35.8,7 42.6,7 42.6,-1.4 35.8,-1.4 ; 66.8,0 66.8,18.4 88,18.4 88,0 66.8,0 ; 70.8,21.9 70.8,36.4 88,36.4 88,21.9 70.8,21.9 ; 70.8,39.5 70.8,54.6 88,54.6 88,39.5 70.8,39.5
  text "AM6254 BOARD - RPI 5 CASE OUTLINE REFERENCE" at 0,78 h2
  text "2D geometry only | Units mm | (0,0) lower left, viewed from above" at 0,74 h1.5
  text "58 mm mounting pitch" at 19,68 h1.4
  text "85.0 mm" at 37,61.3 h1.5
  text "USB 2 stack Y=47" at 90,48.1 h1.2
  text "40 PIN GPIO: ABSOLUTE POS APPROX" at 5,46.5 h1.25
  text "USB 3 stack Y=29.1" at 90,30.2 h1.2
  text "microSD below board (approx)" at -22,30 h1.1
  text "49 mm vertical mounting pitch" at 98,30 h1.3
  text "56 mm vertical" at -19,24 h1.4
  text "RJ45 Y=10.2" at 90,11.3 h1.2
  text "USB-C X=11.2" at 5.7,-6.4 h1.2
  text "micro-HDMI 0 X=25.8" at 20.3,-6.4 h1.2
  text "micro-HDMI 1 X=39.2" at 33.7,-6.4 h1.2
  text "Only 01_OUTLINE and 02_HOLES_NPTH_REFERENCE define board mechanics." at 0,-13 h1.35
  text "Port rectangles, GPIO and SD positions are APPROX and NOT fab cutouts." at 0,-16 h1.35
  text "Hole centres: UL (3.5,52.5), UR (61.5,52.5), LL (3.5,3.5), LR (61.5,3.5)" at 0,-19 h1.25
  text "Top holes dia 3.0 mm, bottom dia 2.7 mm. Validate physical Pi 5 case fit." at 0,-22 h1.3

## Text inside footprints (layer, text, board x,y; h text height)
J10: Top 3D Body "KEEPOUT" at 72.96,53.88 h0.7 r180
J12: Bottom Courtyard "PCB Edge" at 13.4,-0.35 h0.5
SW2: Top Assembly "on" at 61.125,48.468 h0.8